# EAGLE board astra (EAGLE 9.7.0)
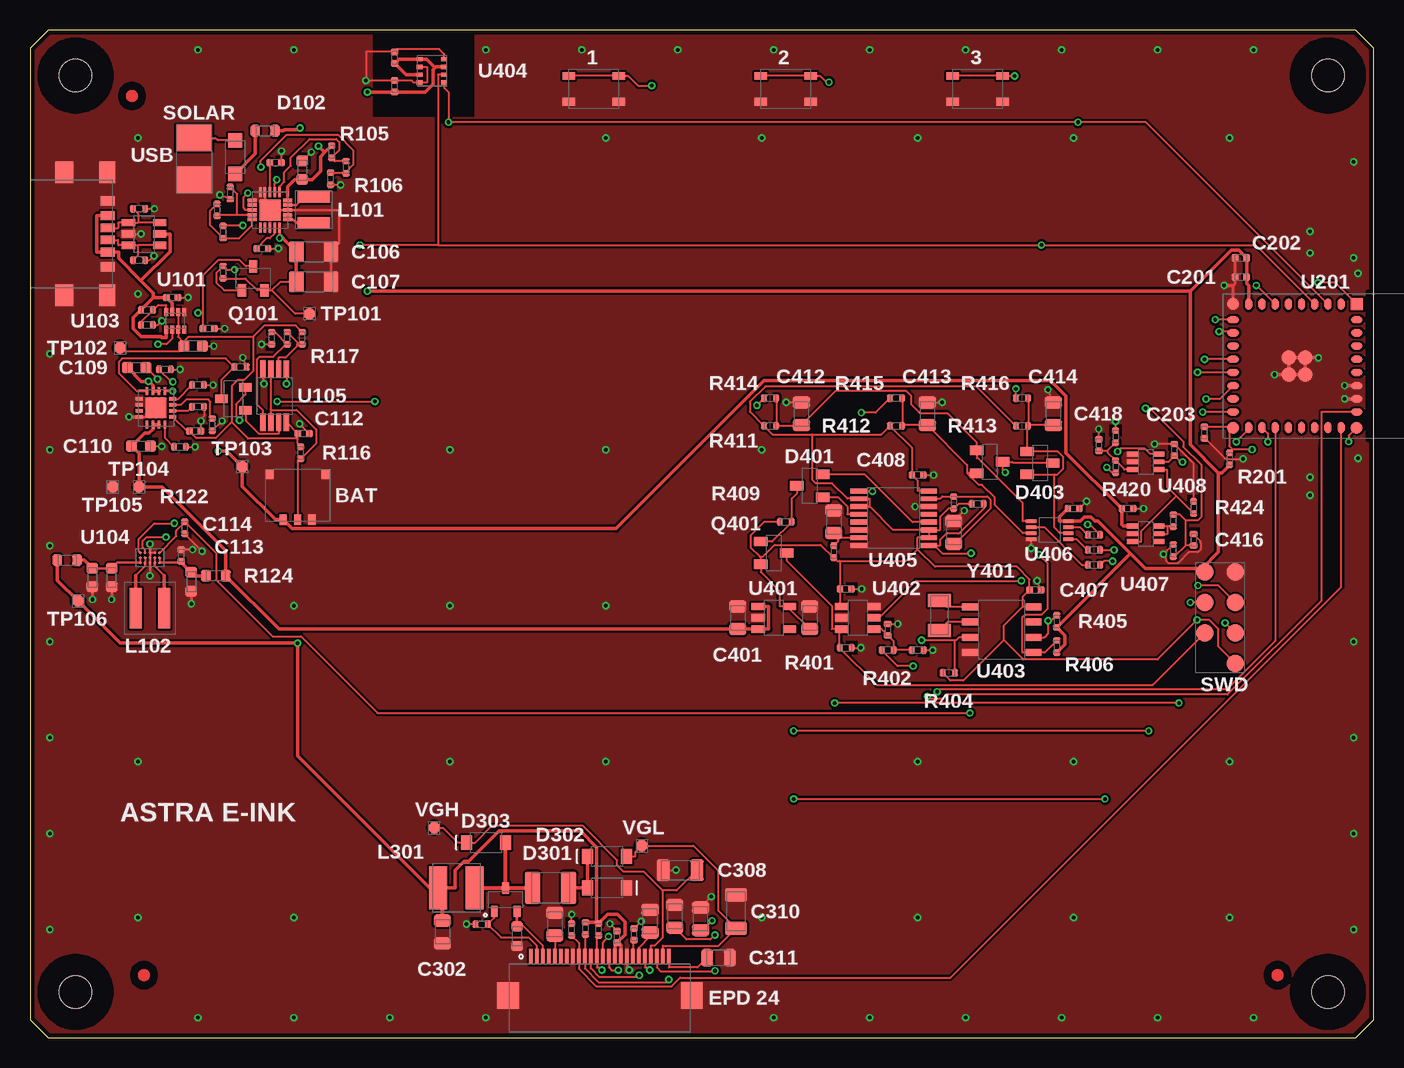
[diagram p0: board, top side]
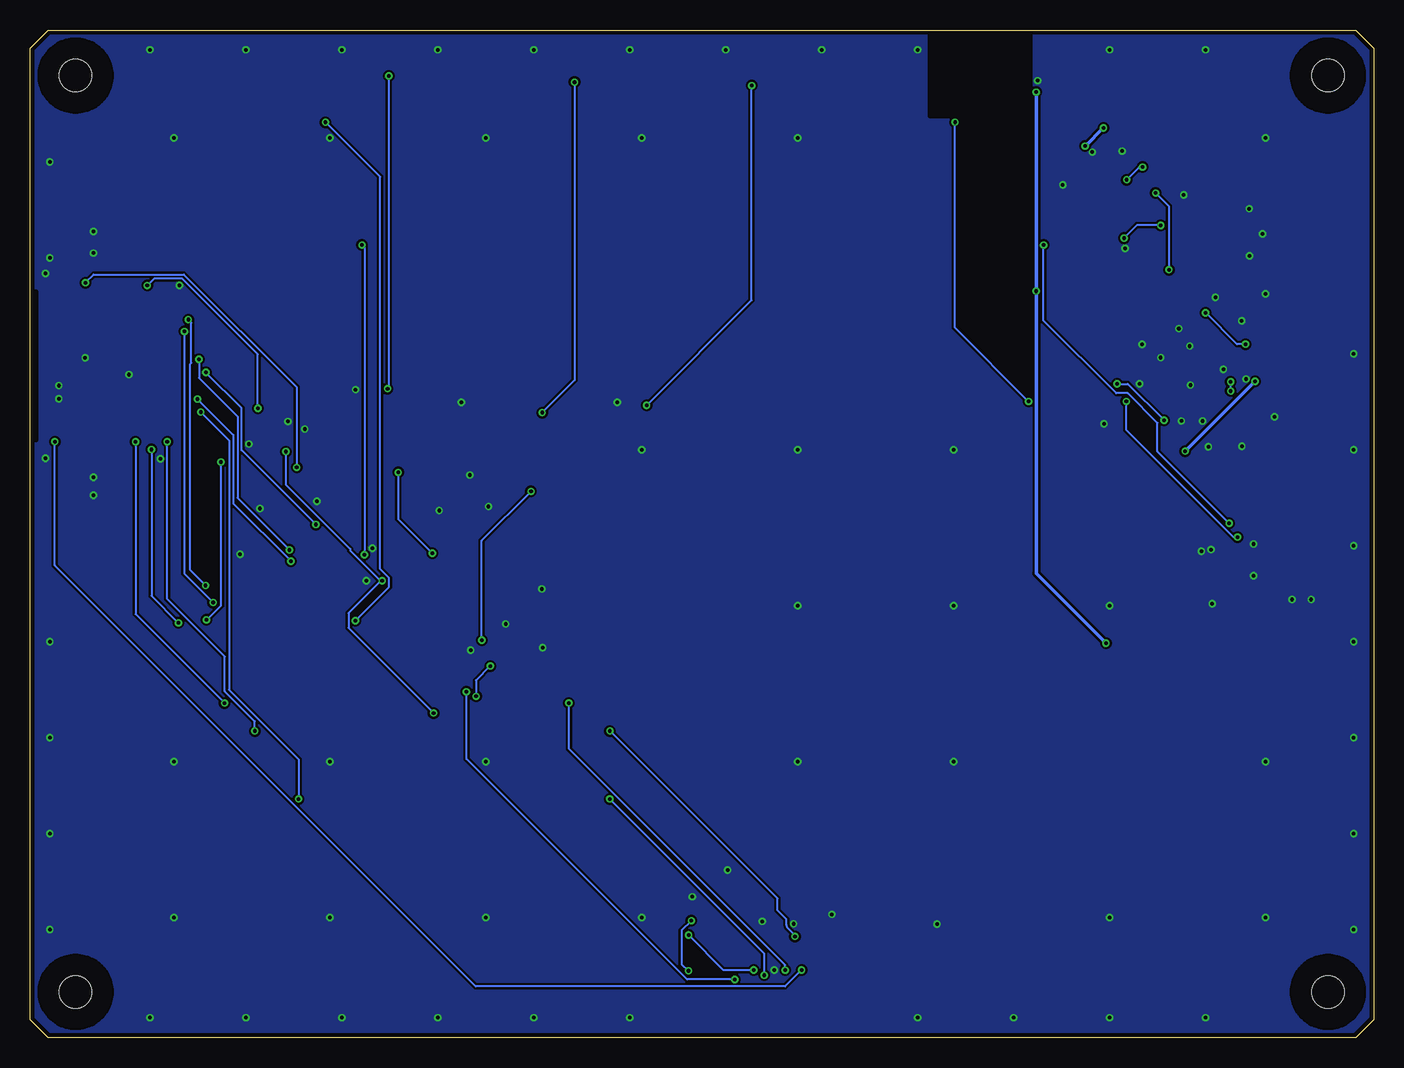
[diagram p1: board, bottom side, seen from below]

Size 112 x 84 mm. Coordinates in mm from the lower left corner, seen from the top.
Outline: 1.5,0 110.5,0 112,1.5 112,82.5 110.5,84 1.5,84 0,82.5 0,1.5 1.5,0
Copper layers (1*16): Top 0.035mm / dielectric 0.93mm / Bottom 0.035mm
Design rules: minimum copper width smd 0.25mm, minimum copper width class=1 0.30mm, minimum copper width 0.15mm, minimum drill size 0.25mm, copper clearance wire_polygon to wire_polygon 0.15mm, copper clearance wire_polygon to pad_smd 0.15mm, copper clearance wire_polygon to via 0.15mm, copper clearance pad_smd to pad_smd 0.15mm, copper clearance pad_smd to via 0.15mm, copper clearance via to via 0.15mm, copper clearance smd to pad (same net) 0.15mm, copper clearance smd to via (same net) 0.15mm, copper clearance smd to smd (same net) 0.15mm, restrict clearance 0mil, dimension clearance 0.35mm, via restrict clearance 0mil, drill distance 0.25mm, keepout clearance 0mil
Net classes: 1 power: width 0.3 mm
Holes 2.7 mm at 3.8,3.8 108.2,3.8 3.8,80.2 108.2,80.2
tRestrict: area 3.8,3.8 to 6.8,6.8; area 0.8,3.8 to 3.8,6.8; area 0.8,0.8 to 3.8,3.8; area 3.8,0.8 to 6.8,3.8; area 108.2,3.8 to 111.2,6.8; area 105.2,3.8 to 108.2,6.8; area 105.2,0.8 to 108.2,3.8; area 108.2,0.8 to 111.2,3.8; area 3.8,80.2 to 6.8,83.2; area 0.8,80.2 to 3.8,83.2; area 0.8,77.2 to 3.8,80.2; area 3.8,77.2 to 6.8,80.2; 5 more areas
bRestrict: area 3.8,3.8 to 6.8,6.8; area 0.8,3.8 to 3.8,6.8; area 0.8,0.8 to 3.8,3.8; area 3.8,0.8 to 6.8,3.8; area 108.2,3.8 to 111.2,6.8; area 105.2,3.8 to 108.2,6.8; area 105.2,0.8 to 108.2,3.8; area 108.2,0.8 to 111.2,3.8; area 3.8,80.2 to 6.8,83.2; area 0.8,80.2 to 3.8,83.2; area 0.8,77.2 to 3.8,80.2; area 3.8,77.2 to 6.8,80.2; 6 more areas
vRestrict: area 3.8,3.8 to 6.8,6.8; area 0.8,3.8 to 3.8,6.8; area 0.8,0.8 to 3.8,3.8; area 3.8,0.8 to 6.8,3.8; area 108.2,3.8 to 111.2,6.8; area 105.2,3.8 to 108.2,6.8; area 105.2,0.8 to 108.2,3.8; area 108.2,0.8 to 111.2,3.8; area 3.8,80.2 to 6.8,83.2; area 0.8,80.2 to 3.8,83.2; area 0.8,77.2 to 3.8,80.2; area 3.8,77.2 to 6.8,80.2; 5 more areas

## Footprints (pad centres in the part's own frame; a part is rotated, then mirrored left to right if it is on the bottom)
C0402 = smd 0.56 x 0.62: 1 -0.48,0; 2 0.48,0
C0603 = smd 0.9 x 0.95: 1 -0.775,0; 2 0.775,0
C1206P = smd 1.25 x 1.75: 1 -1.45,0; 2 1.45,0
EPD_C1210 = smd 1.3 x 2.7: 1 -1.5,0; 2 1.5,0
C0805 = smd 1 x 1.45: 1 -0.95,0; 2 0.95,0
EPD_C1206 = smd 1.1 x 1.8: 1 -1.4,0; 2 1.4,0
ST_SOT23_6_ESD = smd 1.1 x 0.6: 1 -1.3,0.95; 2 -1.3,0; 3 -1.3,-0.95; 4 1.3,-0.95; 5 1.3,0; 6 1.3,0.95
NXP_CFP3_DIODE = smd 1.2 x 1.2: 1 -1.4,0; 2 1.4,0
NXP_SOT23_DIODE = smd 0.7 x 1.05: 1 -0.95,-1; 2 0.95,-1; 3 0,1
MBR0530_CASE425 = smd 0.91 x 1.22: 1 -1.635,0; 2 1.635,0
SOT23_WAKE = smd 1.1 x 0.78: 1 -1.08,0.95; 2 -1.08,-0.95; 3 1.08,0
GCT_USB4135 = smd 0.7 x 1.2: A5 -0.5,3.03; B5 0.5,3.03 | smd 0.76 x 1.2: A9 1.52,3.03; B9 -1.52,3.03 | smd 0.8 x 1.2: A12 2.75,3.03; B12 -2.75,3.03 | smd 1.8 x 1.35: SH1 -5.125,2.98; SH2 5.125,2.98 | smd 1.8 x 1.5: SH3 -5.125,-0.6; SH4 5.125,-0.6
JST_ACH03P_POWER = smd 0.85 x 0.6: 1 2.025,1.2; 2 2.025,0; 3 2.025,-1.2 | smd 0.8 x 0.7: M1 -1.75,2.35; M2 -1.75,-2.35
PV_WIRE_PAIR = smd 2.2 x 3: 1 -1.75,0; 2 1.75,0
SWD_FIXTURE_7 = smd 1.45 x 1.45: 1 -3.81,1.27; 2 -3.81,-1.27; 3 -1.27,1.27; 4 -1.27,-1.27; 5 1.27,1.27; 6 1.27,-1.27; 7 3.81,1.27
FH12_24S_05SH = smd 0.3 x 1.3: 1 -5.75,3.45; 2 -5.25,3.45; 3 -4.75,3.45; 4 -4.25,3.45; 5 -3.75,3.45; 6 -3.25,3.45; 7 -2.75,3.45; 8 -2.25,3.45; 9 -1.75,3.45; 10 -1.25,3.45; 11 -0.75,3.45; 12 -0.25,3.45; 13 0.25,3.45; 14 0.75,3.45; 15 1.25,3.45; 16 1.75,3.45; 17 2.25,3.45; 18 2.75,3.45; 19 3.25,3.45; 20 3.75,3.45; 21 4.25,3.45; 22 4.75,3.45; 23 5.25,3.45; 24 5.75,3.45 | smd 1.8 x 2.2: MP1 -7.65,0.2; MP2 7.65,0.2
BOURNS_SRN3015 = smd 1 x 2.7: 1 -1.1,0; 2 1.1,0
COIL_XGL4015 = smd 0.98 x 3.4: 1 -1.185,0; 2 1.185,0
SRN4018 = smd 1.5 x 3.6: 1 -1.525,0; 2 1.525,0
SOT23_AO3401A = smd 0.7 x 1.05: 1 -0.95,-1; 2 0.95,-1; 3 0,1
BSS138_CASE318 = smd 0.56 x 0.95: 1 -0.95,-0.975; 2 0.95,-0.975; 3 0,0.975
R0402 = smd 0.54 x 0.64: 1 -0.51,0; 2 0.51,0
R0603 = smd 0.8 x 0.95: 1 -0.825,0; 2 0.825,0
ALPS_SKRP = smd 1.05 x 0.65: 1 -2.075,1.075; 2 2.075,1.075; 3 -2.075,-1.075; 4 2.075,-1.075
TP = smd 1 x 1: 1 0,0
SPV_VFQFPN20 = smd 0.8 x 0.25: 1 -1.475,0.8; 2 -1.475,0.4; 3 -1.475,0; 4 -1.475,-0.4; 5 -1.475,-0.8; 11 1.475,-0.8; 12 1.475,-0.4; 13 1.475,0; 14 1.475,0.4; 15 1.475,0.8 | smd 0.25 x 0.8: 6 -0.8,-1.475; 7 -0.4,-1.475; 8 0,-1.475; 9 0.4,-1.475; 10 0.8,-1.475; 16 0.8,1.475; 17 0.4,1.475; 18 0,1.475; 19 -0.4,1.475; 20 -0.8,1.475 | smd 1.75 x 1.75: EP 0,0
TI_RGT16_BQ74 = smd 0.6 x 0.25: 1 -1.4,0.75; 2 -1.4,0.25; 3 -1.4,-0.25; 4 -1.4,-0.75; 9 1.4,-0.75; 10 1.4,-0.25; 11 1.4,0.25; 12 1.4,0.75 | smd 0.25 x 0.6: 5 -0.75,-1.4; 6 -0.25,-1.4; 7 0.25,-1.4; 8 0.75,-1.4; 13 0.75,1.4; 14 0.25,1.4; 15 -0.25,1.4; 16 -0.75,1.4 | smd 1.68 x 1.68: EP 0,0
TI_DRL8_MUX = smd 0.67 x 0.3: 1 -0.74,0.75; 2 -0.74,0.25; 3 -0.74,-0.25; 4 -0.74,-0.75; 5 0.74,-0.75; 6 0.74,-0.25; 7 0.74,0.25; 8 0.74,0.75
RT_WLCSP15 = smd 0.25 x 0.25: A1 -0.4,0.8; A2 0,0.8; A3 0.4,0.8; B1 -0.4,0.4; B2 0,0.4; B3 0.4,0.4; C1 -0.4,0; C2 0,0; C3 0.4,0; D1 -0.4,-0.4; D2 0,-0.4; D3 0.4,-0.4; E1 -0.4,-0.8; E2 0,-0.8; E3 0.4,-0.8
MC_MSOP8_TEMP = smd 1.45 x 0.45: 1 -2.2,0.975; 2 -2.2,0.325; 3 -2.2,-0.325; 4 -2.2,-0.975; 5 2.2,-0.975; 6 2.2,-0.325; 7 2.2,0.325; 8 2.2,0.975
EBYTE_08S1F_LGA40 = smd 1 x 1: 1 -5.15,2.55; 10 -5.15,-7.75; 19 5.15,-7.75; 28 5.15,2.55 | smd 1 x 0.6: 2 -5.15,1.25; 3 -5.15,0.15; 4 -5.15,-0.95; 5 -5.15,-2.05; 6 -5.15,-3.15; 7 -5.15,-4.25; 8 -5.15,-5.35; 9 -5.15,-6.45; 20 5.15,-6.45; 21 5.15,-5.35; 22 5.15,-4.25; 23 5.15,-3.15; 24 5.15,-2.05; 25 5.15,-0.95; 26 5.15,0.15; 27 5.15,1.25 | smd 0.6 x 1: 11 -3.85,-7.75; 12 -2.75,-7.75; 13 -1.65,-7.75; 14 -0.55,-7.75; 15 0.55,-7.75; 16 1.65,-7.75; 17 2.75,-7.75; 18 3.85,-7.75; 29 3.85,2.55; 30 2.75,2.55; 31 1.65,2.55; 32 0.55,2.55; 33 -0.55,2.55; 34 -1.65,2.55; 35 -2.75,2.55; 36 -3.85,2.55 | smd 1.2 x 1.2: 37 -0.675,-1.725; 38 -0.675,-3.125; 39 0.725,-3.125; 40 0.725,-1.725
TI_DBV5_W = smd 1.1 x 0.6: 1 -1.3,0.95; 2 -1.3,0; 3 -1.3,-0.95; 4 1.3,-0.95; 5 1.3,0.95
TI_DDC6_TPL = smd 1.1 x 0.6: 1 -1.35,0.95; 2 -1.35,0; 3 -1.35,-0.95; 4 1.35,-0.95; 5 1.35,0; 6 1.35,0.95
NXP_SO8_RTC = smd 1.3 x 0.6: 1 -2.65,1.905; 2 -2.65,0.635; 3 -2.65,-0.635; 4 -2.65,-1.905; 5 2.65,-1.905; 6 2.65,-0.635; 7 2.65,0.635; 8 2.65,1.905
BOSCH_BME280 = smd 0.5 x 0.35: 1 1.025,0.975; 2 1.025,0.325; 3 1.025,-0.325; 4 1.025,-0.975; 5 -1.025,-0.975; 6 -1.025,-0.325; 7 -1.025,0.325; 8 -1.025,0.975
NXP_TSSOP16_MONO = smd 1.35 x 0.4: 1 -2.925,2.275; 2 -2.925,1.625; 3 -2.925,0.975; 4 -2.925,0.325; 5 -2.925,-0.325; 6 -2.925,-0.975; 7 -2.925,-1.625; 8 -2.925,-2.275; 9 2.925,-2.275; 10 2.925,-1.625; 11 2.925,-0.975; 12 2.925,-0.325; 13 2.925,0.325; 14 2.925,0.975; 15 2.925,1.625; 16 2.925,2.275
TI_DCU8_KEY = smd 0.85 x 0.3: 1 -1.55,0.75; 2 -1.55,0.25; 3 -1.55,-0.25; 4 -1.55,-0.75; 5 1.55,-0.75; 6 1.55,-0.25; 7 1.55,0.25; 8 1.55,0.75
TI_DCK6_SENSE = smd 0.9 x 0.4: 1 -1.1,0.65; 2 -1.1,0; 3 -1.1,-0.65; 4 1.1,-0.65; 5 1.1,0; 6 1.1,0.65
ABRACON_ABS07 = smd 1.1 x 1.9: 1 -1.25,0; 2 1.25,0

## Placement (x,y rotation side)
C101  1uF 16V X5R  [C0402]  11.85,61.7 0 top
C102  4.7uF 16V X5R  [C0603]  13.6,57.65 0 top
C103  4.7uF 16V X5R  [C0603]  22.7,72.3 90 top
C104  10nF 25V X7R  [C0402]  20.48,72.95 0 top
C105  1uF 16V X5R  [C0402]  19.38,65.78 0 top
C106  47uF 10V X5R  [C1206P]  23.65,65.5 0 top
C107  47uF 10V X5R  [C1206P]  23.65,63 0 top
C108  1uF 16V X5R  [C0402]  14.9,59.1 0 top
C109  22uF 16V X5R  [C0603]  8.9,55.85 0 top
C110  22uF 16V X5R  [C0603]  9.25,49.3 0 top
C111  1uF 16V X5R  [C0402]  13.77,50.55 0 top
C112  100nF 16V X7R  [C0402]  22.8,50.35 0 top
C113  22uF 16V X5R  [C0603]  13.45,38 270 top
C114  100nF 16V X7R  [C0402]  12.6,40.2 90 top
C115  22uF 10V X5R  [C0603]  6.8,38.35 270 top
C116  22uF 10V X5R  [C0603]  5.2,38.35 270 top
C201  100 nF  [C0402]  100.95,63.4 180 top
C202  1 µF  [C0402]  100.95,65 180 top
C203  33 pF  [C0402]  97.9,50.45 270 top
C301  4.7uF 50V X7R  [EPD_C1210]  43.4,12.47 0 top
C302  4.7uF 25V X5R  [C0805]  34.38,8.8 270 top
C303  1uF 50V X7R  [C0805]  43.75,9.45 90 top
C304  100nF 16V X7R  [C0402]  48.95,8.4 90 top
C305  1uF 25V X5R  [C0402]  50.35,8.6 90 top
C306  1uF 50V X7R  [C0805]  51.7,9.7 90 top
C307  1uF 50V X7R  [C0805]  53.75,10.1 90 top
C308  1uF 100V X7R  [EPD_C1206]  54.2,13.95 180 top
C309  1uF 50V X7R  [C0805]  55.9,9.9 90 top
C310  1uF 100V X7R  [EPD_C1206]  58.85,10.5 90 top
C311  1uF 50V X7R  [C0805]  57.4,6.65 0 top
C401  4.7u 16V  [C0805]  59,35 90 top
C402  4.7u 16V  [C0805]  65,35 90 top
C403  100n 16V  [C0402]  68,37.4 0 top
C404  10n 50V  [C0402]  71.5,34 90 top
C405  100n 16V  [C0402]  30.4,81.7 90 top
C406  100n 16V  [C0402]  30.4,79.3 90 top
C407  100n 16V  [C0402]  83.8,37.3 0 top
C408  100n 16V  [C0402]  74,46.9 0 top
C409  4.7u 16V  [C0805]  77,42.1 90 top
C410  4.7u 16V  [C0805]  67,43 90 top
C411  100n 16V  [C0402]  87,44.1 0 top
C412  4.7u 16V  [C0805]  64.3,52 90 top
C413  4.7u 16V  [C0805]  74.8,52 90 top
C414  4.7u 16V  [C0805]  85.3,52 90 top
C415  1u 25V  [C0402]  91.5,44.1 0 top
C416  1n 50V  [C0402]  97,41.5 90 top
C417  100n 16V  [C0402]  95.4,49 90 top
C418  10n 50V  [C0402]  89.1,49.4 90 top
D101  USBLC6-2SC6  [ST_SOT23_6_ESD]  9.5,67 0 top
D102  PMEG2010ER,115  [NXP_CFP3_DIODE]  17.1,73.4 90 top
D103  BAT54C,215  [NXP_SOT23_DIODE]  16.95,53.25 90 top
D301  MBR0530 30V Schottky  [MBR0530_CASE425]  48.1,12.47 180 top
D302  MBR0530 30V Schottky  [MBR0530_CASE425]  48.1,15.1 0 top
D303  MBR0530 30V Schottky  [MBR0530_CASE425]  38.02,16.25 0 top
D401  Dual Schottky common anode  [SOT23_WAKE]  65,46 180 top
D402  Dual Schottky common anode  [SOT23_WAKE]  80,48 0 top
D403  Dual Schottky common anode  [SOT23_WAKE]  84.2,47.9 0 top
J101  USB-C power input  [GCT_USB4135]  3.45,67 270 top
J102  LP223439 pack, black / yellow / red  [JST_ACH03P_POWER]  22.3,45.2 270 top
J103  PV+ / PV− wire lands  [PV_WIRE_PAIR]  13.7,73.25 270 top
J201  7-pad SWD fixture  [SWD_FIXTURE_7]  99.2,35 270 top
J301  EPD FPC 24 bottom-contact  [FH12_24S_05SH]  47.5,3.3 0 top
L101  22uH 0.58A  [BOURNS_SRN3015]  23.65,69 270 top
L102  0.47uH 4.4A at 10% drop  [COIL_XGL4015]  10,35.8 180 top
L301  10uH 1.4A Isat  [SRN4018]  35.55,12.47 0 top
Q101  AO3401A  [SOT23_AO3401A]  18.6,63.3 0 top
Q301  BSS138L 50V NMOS  [BSS138_CASE318]  39.65,11.5 0 top
Q401  P-channel wake drive  [SOT23_WAKE]  62,40.4 0 top
R101  5.1k 1%  [R0402]  9.1,69.1 0 top
R102  5.1k 1%  [R0402]  9.1,64.8 0 top
R103  301k 1%  [R0402]  9.75,60.65 0 top
R104  100k 1%  [R0402]  9.75,59.4 0 top
R105  6.8M 1%  [R0402]  25.15,73.85 270 top
R106  360k 1%  [R0402]  26.35,72.55 270 top
R107  1.5M 1%  [R0402]  25.05,71.6 270 top
R108  6.8M 1%  [R0402]  16.1,67.15 270 top
R109  1.5M 1%  [R0402]  15.6,69 270 top
R110  2.7M 1%  [R0402]  16.7,70.4 270 top
R111  1M 1%  [R0402]  16.1,63.8 270 top
R112  10k 1%  [R0402]  11.25,55.7 0 top
R113  2k 1%  [R0402]  12.5,49.25 0 top
R114  68k 1%  [R0402]  14,52.6 0 top
R115  8.66k 1%  [R0402]  14,54.4 0 top
R116  22k 1%  [R0402]  22.58,48.75 270 top
R117  62k 1%  [R0402]  22.7,58.3 270 top
R118  22k 1%  [R0402]  21.45,58.3 270 top
R119  22k 1%  [R0402]  20.15,58.3 270 top
R120  22k 1%  [R0402]  17.55,55.9 0 top
R122  1M 1%  [R0402]  12.9,42.5 270 top
R123  4.7k 1%  [R0402]  15.2,51.1 270 top
R124  0R 1A DFT input  [R0603]  15.5,38.5 0 top
R125  0R 1A DFT output  [R0603]  3.1,39.8 180 top
R126  0R 1A DFT solar  [R0603]  19.6,75.6 180 top
R201  10 kΩ  [R0402]  100,48.25 90 top
R301  10k 1%  [R0402]  37.65,9.45 0 top
R302  3R 1% 100mW  [R0603]  40.6,8.45 90 top
R303  100k 1%  [R0402]  47.4,9 90 top
R304  100k 1%  [R0402]  46.3,9.1 90 top
R305  100k 1%  [R0402]  45.15,9 90 top
R401  30k 1%  [R0402]  68,32.5 0 top
R402  33k 1%  [R0402]  71.5,32.3 0 top
R403  100k 1%  [R0402]  74,32.3 0 top
R404  47k 1%  [R0402]  76.6,30.4 0 top
R405  4.7k 1%  [R0402]  85.6,34.7 90 top
R406  4.7k 1%  [R0402]  85.6,32.6 90 top
R407  47k 1%  [R0402]  77,44.6 90 top
R408  47k 1%  [R0402]  67,40.5 90 top
R409  100k 1%  [R0402]  63,43 0 top
R410  47k 1%  [R0402]  79,44.5 0 top
R411  100k 1%  [R0402]  61.7,51 0 top
R412  100k 1%  [R0402]  72.2,51 0 top
R413  100k 1%  [R0402]  82.7,51 0 top
R414  330R 1%  [R0402]  61.7,53.3 0 top
R415  330R 1%  [R0402]  72.2,53.3 0 top
R416  330R 1%  [R0402]  82.7,53.3 0 top
R417  3.3k 1%  [R0402]  88.7,41.9 0 top
R418  3.3k 1%  [R0402]  88.7,40.65 0 top
R419  3.3k 1%  [R0402]  88.7,39.4 0 top
R420  10k 1%  [R0402]  95.3,43.1 90 top
R421  10k 1%  [R0402]  95.3,40.6 90 top
R422  10k 1%  [R0402]  90.5,47.6 90 top
R423  100k 1%  [R0402]  90.5,50.1 90 top
R424  10k 1%  [R0402]  97,44.2 90 top
SW401  Key 1  [ALPS_SKRP]  47,79.1 0 top
SW402  Key 2  [ALPS_SKRP]  63,79.1 0 top
SW403  Key 3  [ALPS_SKRP]  79,79.1 0 top
TP101  PV_STORE  [TP]  23.3,60.35 270 top
TP102  CHG_IN  [TP]  7.5,57.5 270 top
TP103  VBAT  [TP]  17.7,47.6 270 top
TP104  SYS_AON  [TP]  9.1,45.9 270 top
TP105  GND  [TP]  6.9,45.9 270 top
TP106  VMAIN  [TP]  4,36.4 270 top
TP301  EPD_VGH  [TP]  33.7,17.5 0 top
TP302  EPD_VGL  [TP]  51,16 0 top
U101  SPV1050TTR  [SPV_VFQFPN20]  20,69 270 top
U102  BQ24074RGTR  [TI_RGT16_BQ74]  10.5,52.5 270 top
U103  TPS2116DRLR  [TI_DRL8_MUX]  12.1,59.75 270 top
U104  RT6160AWSC  [RT_WLCSP15]  10,40 270 top
U105  MCP6542-I/MS  [MC_MSOP8_TEMP]  20.4,53.5 270 top
U201  nRF54L15-QFAA + 2.4 GHz PCB antenna  [EBYTE_08S1F_LGA40]  108.05,56 270 top
U401  2.8V always-on  [TI_DBV5_W]  62,35 0 top
U402  One-shot watchdog  [TI_DDC6_TPL]  69,35 0 top
U403  RTC 0x51  [NXP_SO8_RTC]  81,34 0 top
U404  BME280 0x76  [BOSCH_BME280]  33.5,80.6 0 top
U405  Dual event monostable  [NXP_TSSOP16_MONO]  72,43.3 0 top
U406  Key isolation / Schmitt  [TI_DCU8_KEY]  85,42.3 0 top
U407  Gated battery sample  [TI_DCK6_SENSE]  93,42 0 top
U408  Schmitt ADC interlock  [TI_DCK6_SENSE]  93,48 0 top
Y401  32.768 kHz 7pF  [ABRACON_ABS07]  75.8,35.2 270 top

## Library data of the parts
C101 C105 C108 C111 = ASTRA; LCSC: C29266; MPN: CL05A105KO5NNNC
C102 C103 = ASTRA; LCSC: C77045; MPN: GRM188R61C475KE11D
C104 = ASTRA; LCSC: C318576; MPN: CL05B103KA5NNNC
C106 C107 = ASTRA; LCSC: C426659; MPN: GRM31CR61A476KE15L
C109 C110 C113 = ASTRA; LCSC: C5116073; MPN: GRM188R61C226ME01D
C112 C114 C201 C304 C403 C405-C408 C411 C417 = ASTRA; LCSC: C1525; MPN: CL05B104KO5NNNC
C115 C116 = ASTRA; LCSC: C84419; MPN: GRM188R61A226ME15D
C202 C305 C415 = ASTRA; LCSC: C52923; MPN: CL05A105KA5NQNC
C203 = ASTRA; LCSC: C1562; MPN: 0402CG330J500NT
C301 = ASTRA; LCSC: C47783; MPN: CL32B475KBJNNNE
C302 = ASTRA; LCSC: C1779; MPN: CL21A475KAQNNNE
C303 C306 C307 C309 C311 = ASTRA; LCSC: C28323; MPN: CL21B105KBFNNNE
C308 C310 = ASTRA; LCSC: C13832; MPN: CL31B105KCHNNNE
C401 C402 C409 C410 C412-C414 = ASTRA; LCSC: C107365; MPN: CL21B475KOFNNNE
C404 C418 = ASTRA; LCSC: C15195; MPN: CL05B103KB5NNNC
C416 = ASTRA; LCSC: C1523; MPN: 0402B102K500NT
D101 = ASTRA; LCSC: C7519; MPN: USBLC6-2SC6
D102 = ASTRA; LCSC: C82288; MPN: PMEG2010ER,115
D103 = ASTRA; LCSC: C37704; MPN: BAT54C,215
D301-D303 = ASTRA; LCSC: C82046; MPN: MBR0530T1G
D401-D403 = ASTRA; LCSC: C130910; MPN: BAT54A,215
J101 = ASTRA; LCSC: C5438410; MPN: USB4135-GF-A
J102 = ASTRA; LCSC: C5118705; MPN: BM03B-ACHSS-GAN-ETF(LF)(SN)
J103 TP101-TP106 = ASTRA; MPN: PCB-FEATURE
J201 = ASTRA; MPN: PCB pads only
J301 = ASTRA; LCSC: C202112; MPN: FH12-24S-0.5SH(55)
L101 = ASTRA; LCSC: C2918094; MPN: SRN3015-220M
L102 = ASTRA; LCSC: C5452431; MPN: XGL4015-471MEC
L301 = ASTRA; LCSC: C503307; MPN: SRN4018-100M
Q101 Q401 = ASTRA; LCSC: C15127; MPN: AO3401A
Q301 = ASTRA; LCSC: C82045; MPN: BSS138LT1G
R101 R102 = ASTRA; LCSC: C25905; MPN: 0402WGF5101TCE
R103 = ASTRA; LCSC: C25775; MPN: 0402WGF3013TCE
R104 R303-R305 R403 R409 R411-R413 R423 = ASTRA; LCSC: C25741; MPN: 0402WGF1003TCE
R105 R108 = ASTRA; LCSC: C620473; MPN: 0402WGF6804TCE
R106 = ASTRA; LCSC: C45956; MPN: 0402WGF3603TCE
R107 R109 = ASTRA; LCSC: C22276; MPN: 0402WGF1504TCE
R110 = ASTRA; LCSC: C270621; MPN: 0402WGF2704TCE
R111 R122 = ASTRA; LCSC: C26083; MPN: 0402WGF1004TCE
R112 R201 R301 R420-R422 R424 = ASTRA; LCSC: C25744; MPN: 0402WGF1002TCE
R113 = ASTRA; LCSC: C4109; MPN: 0402WGF2001TCE
R114 = ASTRA; LCSC: C36871; MPN: 0402WGF6802TCE
R115 = ASTRA; LCSC: C270576; MPN: 0402WGF8661TCE
R116 R118-R120 = ASTRA; LCSC: C25768; MPN: 0402WGF2202TCE
R117 = ASTRA; LCSC: C37825; MPN: 0402WGF6202TCE
R123 R405 R406 = ASTRA; LCSC: C25900; MPN: 0402WGF4701TCE
R124-R126 = ASTRA; LCSC: C122704; MPN: ERJ3GEY0R00V
R302 = ASTRA; LCSC: C137724; MPN: RC0603FR-073RL
R401 = ASTRA; LCSC: C25776; MPN: 0402WGF3002TCE
R402 = ASTRA; LCSC: C25779; MPN: 0402WGF3302TCE
R404 R407 R408 R410 = ASTRA; LCSC: C25792; MPN: 0402WGF4702TCE
R414-R416 = ASTRA; LCSC: C25104; MPN: 0402WGF3300TCE
R417-R419 = ASTRA; LCSC: C25890; MPN: 0402WGF3301TCE
SW401-SW403 = ASTRA; LCSC: C115360; MPN: SKRPABE010
TP301 TP302 = ASTRA; MPN: PCB test land
U101 = ASTRA; LCSC: C5181469; MPN: SPV1050TTR
U102 = ASTRA; LCSC: C54313; MPN: BQ24074RGTR
U103 = ASTRA; LCSC: C3235557; MPN: TPS2116DRLR
U104 = ASTRA; LCSC: C7065276; MPN: RT6160AWSC
U105 = ASTRA; LCSC: C636338; MPN: MCP6542-I/MS
U201 = ASTRA; LCSC: C54337734; MPN: E73-2G4M08S1F
U401 = ASTRA; LCSC: C5220176; MPN: TPS7A0228PDBVR
U402 = ASTRA; LCSC: C2870554; MPN: TPL5111DDCR
U403 = ASTRA; LCSC: C5151540; MPN: PCF85063AT/AY
U404 = ASTRA; LCSC: C92489; MPN: BME280
U405 = ASTRA; LCSC: C426698; MPN: 74HC123PW,118
U406 = ASTRA; LCSC: C2863927; MPN: SN74AUP3G14DCUR
U407 = ASTRA; LCSC: C2149796; MPN: TPS22919DCKR
U408 = ASTRA; LCSC: C2682139; MPN: SN74AUP1G97DCKR
Y401 = ASTRA; LCSC: C1985277; MPN: ABS07-32.768KHZ-7-1-T

## Nets
ANY_KEY_N: D402.3 D403.3 R410.2 U405.9
BAT_NTC: J102.2 R116.2 U105.3 U105.6
BQ_ILIM: R113.1 U102.12
BQ_ISET: R115.1 U102.16
BQ_ITERM: R123.1 U102.15
BQ_TMR: R114.1 U102.14
BQ_TS: R112.1 U102.1
BTN1: R417.2 U201.15
BTN2: R418.2 U201.14
BTN3: R419.2 U201.16
CHG_DISABLE: D103.3 R120.1 U102.4
CHG_IN: C102.1 C111.1 C112.1 R116.1 R117.1 TP102.1 U102.13 U103.2 U103.7 U105.8
DONE_2V8: C404.1 R402.2 R403.1 U402.4
EPD_BUSY: J301.9 R305.1 U201.27
EPD_CS: J301.12 R303.1 U201.28
EPD_DC: J301.11 U201.18
EPD_GDR: J301.2 Q301.1 R301.2
EPD_MOSI: J301.14 U201.21
EPD_PUMP: C301.2 D301.2 D302.1
EPD_RESE: J301.3 Q301.2 R302.2
EPD_RST: J301.10 R304.1 U201.22
EPD_SCK: J301.13 U201.20
EPD_SW: C301.1 D303.2 L301.2 Q301.3
EPD_VCOM: C311.1 J301.24
EPD_VCORE: C305.1 J301.18
EPD_VGH: C308.1 D303.1 J301.21 TP301.1
EPD_VGL: C310.1 D302.2 J301.23 TP302.1
EPD_VPP: C306.1 J301.19
EPD_VSH1: C307.1 J301.20
EPD_VSH2: C303.1 J301.5
EPD_VSL: C309.1 J301.22
GND: C101.2 C102.2 C103.2 C104.2 C105.2 C106.2 C107.2 C108.2 C109.2 C110.2 C111.2 C112.2 C113.2 C114.2 C115.2 C116.2 C201.2 C202.2 C203.2 C302.2 C303.2 C304.2 C305.2 C306.2 C307.2 C308.2 C309.2 C310.2 C311.2 C401.2 C402.2 C403.2 C404.2 C405.2 C406.2 C407.2 C408.2 C409.2 C410.2 C411.2 C412.2 C413.2 C414.2 C415.2 C416.2 C417.2 C418.2 D101.2 D301.1 J101.A12 J101.B12 J101.SH1 J101.SH2 J101.SH3 J101.SH4 J102.1 J102.M1 J102.M2 J103.2 J201.1 J301.8 J301.17 J301.MP1 J301.MP2 R101.2 R102.2 R104.2 R107.2 R110.2 R112.2 R113.2 R114.2 R115.2 R119.2 R120.2 R122.2 R123.2 R301.1 R302.1 R305.2 R401.2 R403.2 R421.2 R423.2 R424.2 SW401.3 SW401.4 SW402.3 SW402.4 SW403.3 SW403.4 TP105.1 U101.4 U101.5 U101.6 U101.13 U101.18 U101.EP U102.5 U102.6 U102.8 U102.EP U103.1 U104.B1 U104.C1 U104.C2 U104.C3 U105.4 U201.10 U201.30 U201.31 U201.37 U201.38 U201.39 U201.40 U401.2 U402.2 U402.6 U403.4 U404.1 U404.5 U404.7 U405.6 U405.8 U405.14 U406.4 U407.2 U408.1 U408.2
KEY1_N: C412.1 D402.1 R411.2 R414.2 U406.1
KEY1_OUT: R417.1 U406.7
KEY1_SW: R414.1 SW401.1 SW401.2
KEY2_N: C413.1 D402.2 R412.2 R415.2 U406.3
KEY2_OUT: R418.1 U406.5
KEY2_SW: R415.1 SW402.1 SW402.2
KEY3_N: C414.1 D403.1 D403.2 R413.2 R416.2 U406.6
KEY3_OUT: R419.1 U406.2
KEY3_SW: R416.1 SW403.1 SW403.2
KEY_MONO_RC: C410.1 R408.2 U405.7
KEY_PULSE_N: D401.2 U405.12
MAIN_EN: R122.1 U104.A1 U402.5 U408.6
MEAS_FILTER: C418.1 R422.2 R423.1 U408.3
NRST: C203.1 J201.5 R201.2 U201.19
NTC_COLD_REF: R117.2 R118.1 U105.2
NTC_HOT_REF: R118.2 R119.1 U105.5
PULSE_GATE_N: D401.3 Q401.1 R409.2
PV_BUFFER: C105.1 U101.14
PV_EOC: R109.2 R110.1 U101.9
PV_HVSW: L101.1 U101.19
PV_IC_IN: C103.1 R105.1 R126.1 U101.20
PV_IN [power]: D102.1 R126.2
PV_LVSW: L101.2 U101.16
PV_MPP: R105.2 R106.1 U101.1
PV_MPP_REF: C104.1 U101.3
PV_MPP_SET: R106.2 R107.1 U101.2
PV_RAW: D102.2 J103.1
PV_READY_N: Q101.1 R111.1 U101.8
PV_STORE: C106.1 C107.1 Q101.2 R108.1 R111.2 TP101.1 U101.15
PV_UVP: R108.2 R109.1 U101.10
PV_VALID: C108.1 Q101.3 U103.6
RT_SW1: L102.1 U104.B2 U104.B3
RT_SW2: L102.2 U104.D2 U104.D3
RT_VIN_LOCAL: C113.1 C114.1 R124.1 U104.A2 U104.A3
RT_VOUT_LOCAL: C115.1 C116.1 R125.1 U104.E2 U104.E3
RTC_IRQ_N: R404.2 U403.3 U405.1
RTC_MONO_RC: C409.1 R407.2 U405.15
RTC_PULSE_N: D401.1 U405.4
RTC_XI: U403.1 Y401.1
RTC_XO: U403.2 Y401.2
SCL: R405.2 U104.D1 U201.3 U403.6 U404.4
SDA: R406.2 U104.E1 U201.4 U403.5 U404.3
SENSE_SWITCH_EN: R424.1 U407.3 U408.4
SWCLK: J201.3 U201.11
SWDIO: J201.4 U201.12
SYS_AON [power]: C110.1 C401.1 R124.2 TP104.1 U102.10 U102.11 U401.1 U401.3
TEMP_COLD: D103.2 U105.1
TEMP_HOT: D103.1 U105.7
TIMER_DONE: R402.1 U201.29
USB_CC1: D101.1 D101.6 J101.A5 R101.1
USB_CC2: D101.3 D101.4 J101.B5 R102.1
USB_PR: R103.2 R104.1 U103.4
VAON: C402.1 C403.1 C407.1 C408.1 C417.1 J201.7 Q401.2 R404.1 R407.1 R408.1 R409.1 R410.1 R411.1 R412.1 R413.1 U401.5 U402.1 U403.8 U405.2 U405.3 U405.10 U405.11 U405.16 U408.5
VBAT [power]: C109.1 C415.1 J102.3 TP103.1 U102.2 U102.3 U407.1
VBAT_ADC_SRC: R420.1 U407.5 U407.6
VBAT_MEAS_EN: R422.1 U201.1
VBAT_SENSE: C416.1 R420.2 R421.1 U201.7
VBUS [power]: C101.1 D101.5 J101.A9 J101.B9 R103.1 U103.3 U103.5
VMAIN [power]: C201.1 C202.1 C302.1 C304.1 C405.1 C406.1 C411.1 J201.2 J301.15 J301.16 L301.1 R125.2 R201.1 R303.2 R304.2 R405.1 R406.1 TP106.1 U201.9 U404.2 U404.6 U404.8 U406.8
WAKE_MDRV: J201.6 Q401.3 R401.1 U402.3

## Tracks (layer width: path | path; a pad name or v marks a point on that pad's centre or on a via)
ANY_KEY_N  (via drill 0.3 pad 0.6)
  Top 0.18: 75.39,41.02 76.05,40.37 v78.45,40.37 | v81.31,47.12 81.08,47.34 D402.3 81.89,48 81.99,47.9 D403.3 | 75.39,41.02 75.86,41.02 75.86,41.47 76.41,42.02 77.42,42.02 79.51,44.11 R410.2 | U405.9 75.39,41.02
  Bottom 0.18: v81.31,47.12 81.31,43.23 v78.45,40.37
BAT_NTC
  Top 0.18: U105.3 20.07,54.72 20.05,54.7 20.05,52.36 20.07,52.33 | 20.07,52.33 U105.6 | 20.07,52.33 22.22,52.33 23.86,50.69 23.86,49.52 R116.2 22.3,47.96 J102.2
BQ_ILIM
  Top 0.18: R113.1 11.25,49.99 U102.12
BQ_ISET
  Top 0.18: U102.16 12.34,53.25 R115.1
BQ_ITERM
  Top 0.18: R123.1 15.04,51.77 15.04,53.02 14.88,53.18 13.01,53.18 12.58,52.75 U102.15
BQ_TMR
  Top 0.18: R114.1 13.14,52.25 U102.14
BQ_TS  (via drill 0.3 pad 0.6)
  Top 0.18: R112.1 11.77,54.67 v11.9,54.67 | U102.1 v11.9,53.9
  Bottom 0.18: v11.9,53.9 v11.9,54.67
BTN1  (via drill 0.3 pad 0.6)
  Top 0.18: R417.2 88.34,42.77 v88.16,42.77 | U201.15 v97.34,55.45
  Bottom 0.18: v88.16,42.77 94.36,48.97 94.36,52.47 v97.34,55.45
BTN2  (via drill 0.3 pad 0.6)
  Top 0.18: U201.14 v97.91,56.55 | R418.2 v90.37,40.65
  Bottom 0.18: v97.91,56.55 97.91,54.99 94.71,51.79 94.71,44.99 v90.37,40.65
BTN3  (via drill 0.3 pad 0.6)
  Top 0.18: U201.16 99.17,53.23 v98.05,53.23 | v90.24,39.71 89.52,39.71 R419.2
  Bottom 0.18: v98.05,53.23 95.05,50.23 95.05,44.52 v90.24,39.71
CHG_DISABLE
  Top 0.18: D103.3 15.95,54.81 R120.1 16.33,56.61 7.68,56.61 7.4,56.33 7.4,55.39 8.89,53.9 U102.4
CHG_IN
  Top 0.18: 22.32,49.93 C112.1 U105.8 | R116.1 22.32,49.52 22.32,49.93 | 22.32,49.93 18.19,49.93 16.82,51.3 | 16.82,51.3 15.5,49.97 13.87,49.97 C111.1 13.1,50.55 U102.13 | 18.59,58.42 18.59,55.56 17.85,54.82 17.31,54.82 16.82,54.33 16.82,51.3 | TP102.1 7.76,57.24 12.42,57.24 C102.1 12.82,58.03 | R117.1 22.15,59.36 19.54,59.36 18.59,58.42 | 12.82,58.03 13.21,58.42 18.59,58.42 | U103.2 U103.7 12.35,58.42 12.73,58.03 12.82,58.03
DONE_2V8
  Top 0.18: R403.1 R402.2 72.01,33.01 C404.1 70.97,34.05 U402.4
EPD_BUSY
  Top 0.18: U201.27 109.3,37.58 76.71,4.98 54.21,4.98 53.49,4.27 47.2,4.27 45.75,5.72 45.75,5.84 J301.9 45.75,7.89 R305.1
EPD_CS  (via drill 0.3 pad 0.6)
  Top 0.18: U201.28 109.93,50.18 v109.93,49.68 | v47.68,5.63 47.46,5.84 47.25,5.84 J301.12 47.25,8.34 R303.1
  Bottom 0.18: v47.68,5.63 49.05,4.26 74.83,4.26 109.93,39.36 v109.93,49.68
EPD_DC  (via drill 0.3 pad 0.6)
  Top 0.18: v50.8,5.19 50.64,5.04 47.48,5.04 46.75,5.77 J301.11 | U201.18 v97.76,52.15 | v63.67,19.89 v89.62,19.89
  Bottom 0.18: v97.76,52.15 95.4,49.79 95.4,28.99 89.62,23.21 v89.62,19.89 | v63.67,19.89 50.8,7.01 v50.8,5.19
EPD_GDR
  Top 0.18: R301.2 39.26,8.35 41.55,8.35 42.25,7.66 J301.2
  Top 0.2: Q301.1 38.7,9.99 R301.2
EPD_MOSI  (via drill 0.3 pad 0.6)
  Top 0.18: v95.78,27.89 v67.08,27.89 | v49.05,5.61 48.48,5.61 48.25,5.84 J301.14 | U201.21 103.19,50.36 v103.19,49.66
  Bottom 0.18: v49.05,5.61 49.05,6.04 67.08,24.08 v67.08,27.89 | v103.19,49.66 103.19,35.3 v95.78,27.89
EPD_PUMP
  Top 0.3: D302.1 D301.2 C301.2
EPD_RESE
  Top 0.18: J301.3 42.75,7.66 41.13,9.28 R302.2
  Top 0.25: R302.2 Q301.2
EPD_RST  (via drill 0.3 pad 0.6)
  Top 0.18: U201.22 103.8,33.07 99.75,29.02 75.81,29.02 v75.62,28.82 | v53.26,4.83 53.04,4.62 47.39,4.62 46.25,5.76 J301.10 46.25,8.54 R304.1
  Bottom 0.18: v53.26,4.83 57.23,4.83 75.62,23.23 v75.62,28.82
EPD_SCK  (via drill 0.3 pad 0.6)
  Top 0.18: U201.20 101.6,50.71 v100.56,49.67 | v93.26,25.56 v63.65,25.56 | J301.13 47.75,7.91 47.95,8.11 47.95,8.15 v48.23,8.43
  Bottom 0.18: v93.26,25.56 93.26,26.36 95.77,28.87 95.77,31.77 100.56,36.56 v100.56,49.67 | v48.23,8.43 48.23,8.51 48.87,9.15 48.87,9.19 48.91,9.23 48.91,9.35 48.95,9.39 48.95,9.87 49.67,10.59 49.67,11.59 63.63,25.55 v63.65,25.56
EPD_SW
  Top 0.35: Q301.3 D303.2 | Q301.3 C301.1 | L301.2 Q301.3
EPD_VCOM
  Top 0.18: C311.1 55.64,5.84 53.25,5.84 J301.24
EPD_VCORE
  Top 0.18: C305.1 50.25,8.02 J301.18
EPD_VGH
  Top 0.18: 52.73,12.27 51.17,13.82 49.49,13.82 48.95,14.36 48.95,14.79 46.1,17.65 38.49,17.65 37.09,16.25 D303.1 35.67,16.25 34.42,17.5 TP301.1 | C308.1 53.92,12.27 52.73,12.27 | 52.73,12.27 52.73,8.3 52.08,7.66 51.75,7.66 J301.21
EPD_VGL
  Top 0.18: J301.23 52.75,7.66 57.41,7.66 C310.1 57.36,10.59 57.36,13.95 55.31,16 TP302.1 50.45,15.45 50.45,15.1 D302.2
EPD_VPP
  Top 0.18: C306.1 51.7,8.44 50.75,7.49 J301.19
EPD_VSH1  (via drill 0.3 pad 0.6)
  Top 0.18: v51.67,5.62 51.45,5.84 51.25,5.84 J301.20 | v57.09,8.54 56.72,8.18 54.73,8.18 C307.1
  Bottom 0.18: v51.67,5.62 54.17,5.62 v57.09,8.54
EPD_VSH2
  Top 0.18: C303.1 J301.5
EPD_VSL  (via drill 0.3 pad 0.6)
  Top 0.18: v57.11,5.56 57.04,5.49 52.6,5.49 52.25,5.84 J301.22 | v56.86,9.73 56.08,8.95 C309.1
  Bottom 0.18: v56.86,9.73 57.67,8.93 57.67,6.12 v57.11,5.56
GND  (via drill 0.3 pad 0.6)
  Top 0.15: C203.2 97.92,49.97 99.6,48.3 99.62,48.3 99.65,48.27 99.7,48.27 99.72,48.24 v101.12,48.24 | R424.2 97,47.86 95.4,49.46 C417.2 | U105.4 19.43,54.58 v19.5,54.5 | R104.2 10.63,59.4 v10.98,59.75
  Top 0.18: U404.1 34.52,82 34.12,82.41 30.63,82.41 C405.2 28,82.18 v28,79.78 C406.2 31.82,79.78 31.98,79.62 U404.5 33.1,79.62 33.1,80.92 U404.7 | U104.B1 U104.C1 U104.C2 U104.C3 | D101.2 v9.25,67 | C103.2 v23.44,73.82 | C104.2 v20.96,73.9 | R119.2 v19.3,57.79 | C112.2 v22.47,51.16 | C308.2 v53.85,13.95 | U405.14 v73.78,44.27 | C408.2 v75.33,46.9 | C409.2 v77.88,43.93 | C412.2 v63.05,52.95 | R120.2 v17.73,56.69 | R305.2 v45.15,10.26 | C309.2 v56.78,11.73 | U406.4 v83.45,40.8 | C411.2 v88.08,44.7 | C414.2 v84.86,54.01 | R421.2 v94.49,40.3 | R112.2 v12.51,55.7 | C111.2 v14.25,51.4 | C305.2 v50.95,9.68 | R401.2 v69.26,32.5 | R101.2 v10.36,69.1 | C101.2 v13.18,61.7 | C102.2 v15.32,57.65 | R107.2 v25.9,71.09 | R110.2 v15.82,70.25 | C105.2 v20.71,65.78 | C108.2 v16.23,59.1 | R113.2 v13.76,49.25 | R123.2 v16.01,51.4 | R115.2 v15.26,54.4 | C109.2 v10.63,54.9 | C110.2 v10.97,49.3 | R122.2 v14.35,40.54 | R301.1 v36.39,9.45 | C403.2 v69.33,37.4 | R403.2 v75.26,32.3 | C404.2 v72.35,34.48 | C407.2 v83.95,38.09 | C415.2 v92.83,44.1 | C417.2 v93.75,49.48 | R423.2 v90.5,51.36 | C418.2 v89.1,50.73 | R102.2 9.97,64.8 v10.33,65.16 | R114.2 14.51,51.8 14.31,51.6 | J301.17 49.75,5.83 v49.95,5.63 | C416.2 97,41.94 97.56,41.38 97.56,41.3 97.6,41.26 97.6,40.7 97.4,40.5 97.36,40.5 97.32,40.46 96.6,40.46 95.72,39.58 95.68,39.58 95.64,39.54 94.92,39.54 94.72,39.74 94.72,39.86 94.68,39.9 94.68,39.98 94.56,40.1 | C304.2 v48.35,9.48 | C413.2 v76.05,52.95
  Top 0.2: U102.8 9.75,51.75 U102.EP | U104.C1 v10,41.15 | U104.C3 v10,38.5
  Top 0.22: U101.4 19.6,69.4 U101.EP U101.18 25.75,69 25.75,66.25 C106.2 C107.2 | C114.2 v13.55,40.68
  Top 0.24: C116.2 v5.2,36.52 | C115.2 v6.8,36.52 | C113.2 v13.45,36.17
  Top 0.26: C202.2 C201.2 100.47,62.87 100.3,62.7 U201.10
  Top 0.28: 100.3,62.7 v99.55,62.7
  Top 0.3: U201.39 U201.40 U201.37 | U201.37 U201.38 U201.39 | U201.37 v107.4,56.67 | U201.39 v103.75,55.27 | U201.31 v109.6,54.35 | U201.30 v109.6,53.25 | U102.8 v8.25,51.75
  other vias: 14,1.65 14,82.35 22,1.65 22,82.35 30,1.65 38,1.65 38,82.35 46,82.35 54,82.35 62,1.65 62,82.35 70,1.65 70,82.35 78,1.65 78,82.35 86,1.65 86,82.35 94,1.65 94,82.35 102,1.65 102,82.35 1.65,9 110.35,9 1.65,17 110.35,17 1.65,25 110.35,25 1.65,33 110.35,33 1.65,41 1.65,49 1.65,57 110.35,65 110.35,73 9,10 9,23 9,62 9,75 22,10 22,36 35,23 35,36 35,49 48,23 48,36 48,49 48,75 61,10 61,49 61,75 74,10 74,23 74,75 87,10 87,23 87,75 100,10 100,23 100,75 106.7,45.2 106.7,46.7 106.7,65.4 106.7,67.2 110.7,48.3 110.7,63.7
  pour Top (isolate 0.18, rank 6, no thermals): 1.69,0.45 110.31,0.45 111.55,1.69 111.55,82.31 110.31,83.55 1.69,83.55 0.45,82.31 0.45,1.69
  pour Bottom (isolate 0.18, rank 6, no thermals): 1.69,0.45 110.31,0.45 111.55,1.69 111.55,82.31 110.31,83.55 1.69,83.55 0.45,82.31 0.45,1.69
  cutout Top: 10.66,5.2 10.65,5.35 10.62,5.5 10.57,5.64 10.5,5.78 10.42,5.91 10.32,6.02 10.21,6.12 10.08,6.2 9.94,6.27 9.8,6.32 9.65,6.35 9.5,6.36 9.35,6.35 9.2,6.32 9.06,6.27 8.92,6.2 8.79,6.12 8.68,6.02 8.58,5.91 8.5,5.78 8.43,5.64 8.38,5.5 8.35,5.35 8.34,5.2 8.35,5.05 8.38,4.9 8.43,4.76 8.5,4.62 8.58,4.49 8.68,4.38 8.79,4.28 8.92,4.2 9.06,4.13 9.2,4.08 9.35,4.05 9.5,4.04 9.65,4.05 9.8,4.08 9.94,4.13 10.08,4.2 10.21,4.28 10.32,4.38 10.42,4.49 10.5,4.62 10.57,4.76 10.62,4.9 10.65,5.05
  cutout Top: 105.16,5.2 105.15,5.35 105.12,5.5 105.07,5.64 105,5.78 104.92,5.91 104.82,6.02 104.71,6.12 104.58,6.2 104.44,6.27 104.3,6.32 104.15,6.35 104,6.36 103.85,6.35 103.7,6.32 103.56,6.27 103.42,6.2 103.29,6.12 103.18,6.02 103.08,5.91 103,5.78 102.93,5.64 102.88,5.5 102.85,5.35 102.84,5.2 102.85,5.05 102.88,4.9 102.93,4.76 103,4.62 103.08,4.49 103.18,4.38 103.29,4.28 103.42,4.2 103.56,4.13 103.7,4.08 103.85,4.05 104,4.04 104.15,4.05 104.3,4.08 104.44,4.13 104.58,4.2 104.71,4.28 104.82,4.38 104.92,4.49 105,4.62 105.07,4.76 105.12,4.9 105.15,5.05
  cutout Top: 9.66,78.5 9.65,78.65 9.62,78.8 9.57,78.94 9.5,79.08 9.42,79.21 9.32,79.32 9.21,79.42 9.08,79.5 8.94,79.57 8.8,79.62 8.65,79.65 8.5,79.66 8.35,79.65 8.2,79.62 8.06,79.57 7.92,79.5 7.79,79.42 7.68,79.32 7.58,79.21 7.5,79.08 7.43,78.94 7.38,78.8 7.35,78.65 7.34,78.5 7.35,78.35 7.38,78.2 7.43,78.06 7.5,77.92 7.58,77.79 7.68,77.68 7.79,77.58 7.92,77.5 8.06,77.43 8.2,77.38 8.35,77.35 8.5,77.34 8.65,77.35 8.8,77.38 8.94,77.43 9.08,77.5 9.21,77.58 9.32,77.68 9.42,77.79 9.5,77.92 9.57,78.06 9.62,78.2 9.65,78.35
  cutout Top: 9.14,68.58 10.08,68.58 10.08,69.62 9.14,69.62
  cutout Top: 9.14,64.28 10.08,64.28 10.08,65.32 9.14,65.32
  cutout Top: 9.79,58.88 10.73,58.88 10.73,59.92 9.79,59.92
  cutout Top: 11.85,61.19 12.81,61.19 12.81,62.21 11.85,62.21
  cutout Top: 13.72,56.98 15.03,56.98 15.03,58.33 13.72,58.33
  cutout Top: 22.02,72.42 23.38,72.42 23.38,73.72 22.02,73.72
  cutout Top: 20.48,72.44 21.44,72.44 21.44,73.46 20.48,73.46
  cutout Top: 24.53,70.62 25.57,70.62 25.57,71.56 24.53,71.56
  cutout Top: 16.18,69.42 17.22,69.42 17.22,70.36 16.18,70.36
  cutout Top: 19.38,65.27 20.34,65.27 20.34,66.29 19.38,66.29
  cutout Top: 14.9,58.59 15.86,58.59 15.86,59.61 14.9,59.61
  cutout Top: 11.29,55.18 12.23,55.18 12.23,56.22 11.29,56.22
  cutout Top: 12.54,48.73 13.48,48.73 13.48,49.77 12.54,49.77
  cutout Top: 14.04,52.08 14.98,52.08 14.98,53.12 14.04,53.12
  cutout Top: 14.68,50.12 15.72,50.12 15.72,51.06 14.68,51.06
  cutout Top: 14.04,53.88 14.98,53.88 14.98,54.92 14.04,54.92
  cutout Top: 9.03,55.17 10.32,55.17 10.32,56.52 9.03,56.52
  cutout Top: 9.38,48.62 10.68,48.62 10.68,49.98 9.38,49.98
  cutout Top: 13.77,50.04 14.73,50.04 14.73,51.06 13.77,51.06
  cutout Top: 19.63,57.32 20.67,57.32 20.67,58.26 19.63,58.26
  cutout Top: 17.59,55.38 18.53,55.38 18.53,56.42 17.59,56.42
  cutout Top: 22.8,49.84 23.76,49.84 23.76,50.86 22.8,50.86
  cutout Top: 12.38,41.52 13.42,41.52 13.42,42.46 12.38,42.46
  cutout Top: 97.39,49.49 98.41,49.49 98.41,50.45 97.39,50.45
  cutout Top: 36.67,8.93 37.61,8.93 37.61,9.97 36.67,9.97
  cutout Top: 48.44,8.4 49.46,8.4 49.46,9.36 48.44,9.36
  cutout Top: 49.84,8.6 50.86,8.6 50.86,9.56 49.84,9.56
  cutout Top: 44.63,9.04 45.67,9.04 45.67,9.98 44.63,9.98
  cutout Top: 68,36.89 68.96,36.89 68.96,37.91 68,37.91
  cutout Top: 68.04,31.98 68.98,31.98 68.98,33.02 68.04,33.02
  cutout Top: 74.04,31.78 74.98,31.78 74.98,32.82 74.04,32.82
  cutout Top: 70.99,34 72.01,34 72.01,34.96 70.99,34.96
  cutout Top: 83.8,36.79 84.76,36.79 84.76,37.81 83.8,37.81
  cutout Top: 29.89,81.7 30.91,81.7 30.91,82.66 29.89,82.66
  cutout Top: 29.89,79.3 30.91,79.3 30.91,80.26 29.89,80.26
  cutout Top: 74,46.39 74.96,46.39 74.96,47.41 74,47.41
  cutout Top: 87,43.59 87.96,43.59 87.96,44.61 87,44.61
  cutout Top: 91.5,43.59 92.46,43.59 92.46,44.61 91.5,44.61
  cutout Top: 94.78,40.64 95.82,40.64 95.82,41.58 94.78,41.58
  cutout Top: 96.49,41.5 97.51,41.5 97.51,42.46 96.49,42.46
  cutout Top: 94.89,49 95.91,49 95.91,49.96 94.89,49.96
  cutout Top: 89.98,50.14 91.02,50.14 91.02,51.08 89.98,51.08
  cutout Top: 96.48,44.24 97.52,44.24 97.52,45.18 96.48,45.18
  cutout Top: 88.59,49.4 89.61,49.4 89.61,50.36 88.59,50.36
  cutout Top: 28.6,76.8 37,76.8 37,83.5 28.6,83.5
KEY1_N
  Top 0.18: U406.1 82.77,43.05 82.77,44.57 79.04,48.3 78.92,48.3 D402.1 78.92,49.6 76.47,52.05 74.2,52.05 73.45,52.79 73.45,53.5 73.03,53.92 67.17,53.92 C412.1 64.25,51 R411.2 R414.2
KEY1_OUT
  Top 0.18: U406.7 87.54,42.55 R417.1
KEY1_SW  (via drill 0.3 pad 0.6)
  Top 0.18: v51.83,79.36 50.67,79.36 49.86,80.17 SW401.2 SW401.1 | R414.1 v60.6,52.71
  Bottom 0.18: v60.6,52.71 51.83,61.47 v51.83,79.36
KEY2_N
  Top 0.18: 78.11,47.05 79.09,46.07 79.36,46.07 80.42,45.02 80.42,44.4 82.77,42.05 U406.3 | 72.76,51.05 R412.2 | 72.76,51.05 C413.1 78.11,47.74 78.11,47.05 | 72.76,51.05 72.76,53.25 R415.2 | D402.2 78.11,47.05
KEY2_OUT
  Top 0.18: U406.5 87.23,41.55 88.13,40.65 R418.1
KEY2_SW  (via drill 0.3 pad 0.6)
  Top 0.18: SW402.1 SW402.2 65.86,80.17 66.39,79.65 v66.6,79.65 | R415.1 70.49,52.1 v69.31,52.1
  Bottom 0.18: v66.6,79.65 66.6,54.81 v69.31,52.1
KEY3_N
  Top 0.18: 85.4,46.95 85.66,46.95 86.14,47.43 86.14,48.39 85.67,48.85 D403.1 83.12,50.91 R413.2 | D403.2 85.4,46.95 | 85.4,46.95 85.4,42.52 85.87,42.05 U406.6 | C414.1 83.26,51.05 R413.2 | R416.2 R413.2
KEY3_OUT
  Top 0.18: U406.2 84.56,42.55 87.71,39.4 R419.1
KEY3_SW  (via drill 0.3 pad 0.6)
  Top 0.18: SW403.1 SW403.2 81.86,80.17 v82.09,80.17 | R416.1 v82.19,54.09
  Bottom 0.18: v82.09,80.17 82.09,54.2 v82.19,54.09
KEY_MONO_RC
  Top 0.18: 67.38,41.67 U405.7 | C410.1 67.38,41.67 | R408.2 67.38,41.38 67.38,41.67
KEY_PULSE_N
  Top 0.18: U405.12 73.57,42.98 69.6,46.95 D401.2
MAIN_EN  (via drill 0.3 pad 0.6)
  Top 0.18: v78.35,27.06 28.98,27.06 22.59,33.44 20.21,33.44 15.5,38.16 15.5,40.41 R122.1 12.9,42.95 12.21,42.26 12.21,41.8 U104.A1 | U402.5 70.78,35 73.86,38.08 v82.65,38.08 | U408.6 93.39,48.65 92.94,49.11 90.93,49.11 v90.67,48.85
  Bottom 0.18: 82.75,38.08 85.45,35.38 85.45,34.16 v78.35,27.06 | 82.75,38.08 v82.65,38.08 | v90.67,48.85 90.67,46.12 85.29,40.74 85.29,40.62 82.75,38.08
MEAS_FILTER
  Top 0.18: U408.3 91.19,47.35 91.19,47.42 R422.2 89.83,48.78 89.83,48.92 | 89.83,48.92 R423.1 | C418.1 89.83,48.92
NRST  (via drill 0.3 pad 0.6)
  Top 0.18: 100.26,49.02 R201.2 | v101.87,49.02 100.26,49.02 | 100.26,49.02 99.96,49.32 99.96,50.51 U201.19 100.22,50.93 C203.1 | J201.5 v99.63,34.57
  Bottom 0.18: v101.87,49.02 101.87,36.81 v99.63,34.57
NTC_COLD_REF
  Top 0.18: 22.26,57.79 22.26,57.65 21.29,56.68 20.73,56.68 U105.2 | R118.1 22.26,58 22.26,57.79 | 22.26,57.79 R117.2
NTC_HOT_REF
  Top 0.18: U105.5 19.43,52.28 18.94,52.76 18.94,56.55 19.15,56.75 20.28,56.75 21.32,57.79 R118.2 20.43,58.81 R119.1
PULSE_GATE_N
  Top 0.18: Q401.1 61.86,41.35 R409.2 63.51,44.94 63.92,45.35 D401.3
PV_BUFFER
  Top 0.18: U101.14 20.39,67.51 20.39,67.03 19.98,66.63 19.74,66.63 C105.1
PV_EOC
  Top 0.18: 17.28,68.6 U101.9 | R109.2 15.71,68.6 17.28,68.6 | 17.28,68.6 17.28,70.33 R110.1
PV_HVSW
  Top 0.22: L101.1 22.9,70.1 22.2,69.4 U101.19
PV_IC_IN  (via drill 0.3 pad 0.6)
  Top 0.2: U101.20 21.48,70.15
  Top 0.3: 21.48,70.15 21.48,70.95 22.05,71.53 C103.1 23.5,71.53 24.22,72.25 24.22,73.45 24.56,73.79 | 24.56,73.79 25.13,74.36 R105.1 | R126.1 21.11,75.6 21.16,75.64 21.2,75.64 21.23,75.68 22.36,75.68 v22.52,75.84 | v24.04,74.32 24.56,73.79
  Bottom 0.3: v22.52,75.84 v24.04,74.32
PV_IN
  Top 0.3: R126.2 18.77,73.68 D102.1
PV_LVSW
  Top 0.22: L101.2 22.25,67.9 21.95,68.2 U101.16
PV_MPP
  Top 0.17: 21.2,72.13 21.2,71.35 20.8,70.95 U101.1
  Top 0.18: 21.2,72.13 21.75,72.68 21.75,73.36 23.3,74.91 25.53,74.91 25.78,74.66 25.78,73.97 R105.2 25.43,73.06 R106.1
PV_MPP_REF
  Top 0.18: U101.3 C104.1
PV_MPP_SET  (via drill 0.3 pad 0.6)
  Top 0.17: v20.57,71.52 20.57,71.38 20.4,71.18 U101.2
  Top 0.18: v19.24,72.57 19.24,73.1 21.4,75.25 25.67,75.25 26.95,73.98 26.95,72.76 26.3,72.11 26.11,72.11 | 26.11,72.11 26.28,72.11 R106.2 | R107.1 26.11,72.11
  Bottom 0.18: v20.57,71.52 19.52,72.57 v19.24,72.57
PV_RAW
  Top 0.18: J103.1 15.46,75 15.66,74.8 D102.2
PV_READY_N  (via drill 0.3 pad 0.6)
  Top 0.18: v17.06,64.01 16.4,64.01 R111.1 15.52,63.73 15.52,62.95 16.17,62.3 Q101.1 | U101.8 17.97,69 17.8,69.17 17.8,70.05 v18.16,70.41
  Bottom 0.18: v18.16,70.41 17.06,69.31 v17.06,64.01
PV_STORE  (via drill 0.3 pad 0.6)
  Top 0.18: v20.8,66.65 20.8,66.95 | R108.1 16.15,67.71 v17.74,67.71 | R111.2 17.95,63.29 18.94,62.3 Q101.2 20.16,62.3 | TP101.1 22.11,60.35 20.16,62.3 | C107.1 20.86,63 20.16,62.3
  Top 0.22: U101.15 20.8,66.95
  Top 0.3: C107.1 C106.1 20.8,66.95
  Bottom 0.18: v17.74,67.71 19.73,67.71 v20.8,66.65
PV_UVP
  Top 0.18: U101.10 18.52,67.71 17.46,66.64 R108.2 15.02,67.72 15.02,68.92 R109.1
PV_VALID  (via drill 0.3 pad 0.6)
  Top 0.18: 14.42,60.42 14.42,63.56 15.71,64.85 17.44,64.85 17.99,64.3 Q101.3 | C108.1 14.42,60.42 | v14,60.42 14.42,60.42 | U103.6 11.85,58.27 11.38,57.8 v10.67,57.8
  Bottom 0.18: v10.67,57.8 11.38,57.8 v14,60.42
RT_SW1
  Top 0.18: U104.B2 U104.B3
  Top 0.2: 11.19,38.52 10.4,39.3 U104.B3
  Top 0.3: 11.19,38.52 L102.1
RT_SW2
  Top 0.18: U104.D2 U104.D3
  Top 0.2: 8.81,38.52 9.6,39.3 U104.D3
  Top 0.3: 8.81,38.52 L102.2
RT_VIN_LOCAL
  Top 0.18: U104.A2 U104.A3
  Top 0.2: C114.1 12.48,39.6 U104.A3
  Top 0.3: R124.1 13.72,38.5 C113.1 12.6,39.62 C114.1
RT_VOUT_LOCAL
  Top 0.18: U104.E2 U104.E3
  Top 0.2: C116.1 C115.1 7.28,39.6 U104.E3
  Top 0.3: R125.1 4.53,39.8 C116.1
RTC_IRQ_N  (via drill 0.3 pad 0.6)
  Top 0.18: 77.11,33.13 77.21,33.13 77.44,33.37 U403.3 | v74.33,33.13 77.11,33.13 | R404.2 77.11,33.13 | U405.1 70.19,45.58 v70.23,45.53
  Bottom 0.18: v74.33,33.13 74.33,41.43 v70.23,45.53
RTC_MONO_RC
  Top 0.18: C409.1 77.1,41.15 80.07,44.12 80.07,44.85 79.81,45.11 R407.2 76.04,45.11 75.86,44.92 U405.15
RTC_PULSE_N
  Top 0.18: U405.4 68.14,43.62 68.14,44.27 67.37,45.05 D401.1
RTC_XI
  Top 0.18: Y401.1 76.34,35.91 U403.1
RTC_XO
  Top 0.18: Y401.2 76.48,34.63 U403.2
SCL  (via drill 0.3 pad 0.6)
  Top 0.18: U104.D1 9.6,40.63 9.41,40.82 9.41,41.4 9.73,41.72 v11.33,41.72 | R405.2 85.14,34.76 v84.87,34.76 84.87,33.68 84.56,33.37 U403.6 | U201.3 93.04,76.31 v87.36,76.31 v34.89,76.31 34.89,78.83 34.52,79.19 U404.4 | v20.61,53.03 v28.75,53.03
  Bottom 0.18: v11.33,41.72 11.67,41.72 20.61,50.66 v20.61,53.03 | v84.87,34.76 82.07,37.55 82.07,38.32 82.81,39.05 82.81,71.76 v87.36,76.31 | v28.75,53.03 34.89,59.17 v34.89,76.31
SDA  (via drill 0.3 pad 0.6)
  Top 0.18: 34.02,66.07 v27.5,66.07 | 34.02,66.07 v84.33,66.07 102.18,66.07 U201.4 | 34.02,66.07 34.02,80.28 U404.3 | U104.E1 9.05,40.55 9.05,41.56 10.36,42.87 v12.03,42.87 | v84.12,40.25 84.84,39.52 84.84,35.76 84.35,35.27 82.96,35.27 82.74,35.05 82.74,32.09 U403.5 84.58,32.09 R406.2
  Bottom 0.18: v12.03,42.87 18.01,48.86 18.01,51.24 20.5,53.72 21.45,53.72 27.5,59.77 v27.5,66.07 | v84.33,66.07 84.12,65.86 v84.12,40.25
SENSE_SWITCH_EN
  Top 0.18: 95.56,45.13 94.81,45.88 94.81,47.35 U408.4 | R424.1 95.56,45.13 | 95.56,45.13 92.61,42.19 92.61,41.35 U407.3
SWCLK  (via drill 0.3 pad 0.6)
  Top 0.18: J201.3 99.05,37.69 v97.36,37.69 | U201.11 v98.81,59.85
  Bottom 0.18: v97.36,37.69 98.64,38.97 98.64,56.15 98.55,56.24 98.55,59.59 v98.81,59.85
SWDIO  (via drill 0.3 pad 0.6)
  Top 0.18: U201.12 100.19,58.86 v99.13,58.86 | J201.4 v96.73,36.27
  Bottom 0.18: v99.13,58.86 99.13,38.67 v96.73,36.27
SYS_AON
  Top 0.3: U401.1 61.57,35.95 61.57,34.05 U401.3 C401.1 20.77,34.05 R124.2 16.32,40.6 11.02,45.9 TP104.1 9.1,48.67 C110.1 9.55,50.38 9.9,50.38 10.25,50.73 U102.10 U102.11
TEMP_COLD  (via drill 0.3 pad 0.6)
  Top 0.18: v17.46,51.47 17.17,51.76 17.17,52.81 17.95,53.59 D103.2 | U105.1 v21.38,54.49
  Bottom 0.18: v21.38,54.49 v21.37,54.49 | v21.37,54.49 | v21.37,54.49 20.48,54.49 v17.46,51.47
TEMP_HOT
  Top 0.18: D103.1 18.03,52.22 18.03,51.38 19.09,50.32 20.73,50.32 U105.7
TIMER_DONE  (via drill 0.3 pad 0.6)
  Top 0.16: 107.65,49.35 107.65,52.15 U201.29
  Top 0.18: 107.65,49.35 107.65,36.41 99.83,28.59 76.4,28.59 76.05,28.24 75.02,28.24 v74.81,28.45 | v73.63,30.97 72.32,30.97 R402.1
  Bottom 0.18: v73.63,30.97 74.81,29.78 v74.81,28.45
USB_CC1
  Top 0.18: J101.A5 7.34,67.5 7.34,67.89 7.39,67.95 D101.1 9.01,67.95 | D101.6 9.01,67.95 | R101.1 9.01,68.68 9.01,67.95
USB_CC2
  Top 0.18: J101.B5 7.34,66.5 7.34,66.11 7.39,66.05 D101.3 9.01,66.05 | D101.4 9.01,66.05 | R102.1 9.01,65.22 9.01,66.05
USB_PR
  Top 0.18: R104.1 9.24,59.63 R103.2 10.69,61.08 11.35,61.08 U103.4
VAON  (via drill 0.3 pad 0.6)
  Top 0.18: 73.99,40.7 75.44,39.25 82.27,39.25 83.32,38.2 C407.1 82.74,36.72 82.74,35.91 | 81.17,33.14 77.79,29.77 76.72,29.77 R404.1 | 81.17,33.14 82.8,31.51 93.98,31.51 v97.29,34.82 98.3,34.82 99.07,34.05 99.07,32.59 J201.7 | v96.08,47.98 95.94,47.98 C417.1 94.88,48 U408.5 | 65.22,50.28 70.97,50.28 R412.1 73.52,49.17 C408.1 73.99,46.43 73.99,45.58 U405.16 | 65.22,50.28 61.91,50.28 R411.1 60.02,52.17 60.02,53 61.3,54.28 78.91,54.28 R413.1 | 65.22,50.28 65.22,46.5 65.53,46.19 66.87,46.19 68.14,44.92 U405.2 70.01,44.92 70.01,44.27 | 81.17,33.14 81.17,34.34 82.74,35.91 | 67.52,39.73 73.02,39.73 73.99,40.7 | 67.52,39.73 67.26,39.73 R408.1 65.91,41.08 62.08,41.08 61.09,40.1 60.92,40.1 | 67.52,39.73 C403.1 67.52,36.08 U402.1 | 73.99,40.7 73.99,41.67 U405.10 U405.11 | R409.1 61.2,43 60.07,41.87 60.07,40.87 60.84,40.1 60.92,40.1 | C402.1 63.3,35.75 U401.5 62.49,35.95 62.49,37.23 60.92,38.8 Q401.2 60.92,40.1 | U405.11 71.96,42.33 70.01,44.27 | U403.8 82.74,35.91 | R410.1 77.41,44.5 R407.1 76.57,44.09 75.86,43.38 75.86,42.33 U405.11 | U405.3 70.01,44.27
  Bottom 0.18: v97.29,34.82 96.08,36.03 v96.08,47.98
VBAT  (via drill 0.3 pad 0.6)
  Top 0.3: v15.7,48.89 16.41,48.89 TP103.1 17.7,45.96 20.48,43.17 J102.3 21.84,42.43 48.86,42.43 61.19,54.76 85.08,54.76 86.37,53.46 86.37,48.75 C415.1 91.02,42.76 91.13,42.65 U407.1 | C109.1 9.27,54.71 v9.88,54.71 10.25,54.33 U102.3 U102.2
  Bottom 0.3: v15.7,48.89 v9.88,54.71
VBAT_ADC_SRC
  Top 0.18: U407.5 94.81,42 94.81,42.65 | 94.81,42.65 U407.6 94.81,42.65 | R420.1 94.87,42.59 94.81,42.65
VBAT_MEAS_EN  (via drill 0.3 pad 0.6)
  Top 0.18: U201.1 108.82,62.93 v107.38,62.93 | v89.77,47.53 90.2,47.09 R422.1
  Bottom 0.18: v107.38,62.93 106.69,63.62 99.17,63.62 89.77,54.22 v89.77,47.53
VBAT_SENSE  (via drill 0.3 pad 0.6)
  Top 0.18: U201.7 102.26,62.69 v102.23,62.69 | 96.34,43.12 95.84,43.61 R420.2 | 96.34,41.02 96.34,43.12 | v93,52.46 93.36,52.46 96.13,49.69 96.13,49.25 97.63,47.75 97.63,43.39 97.36,43.12 96.34,43.12 | R421.1 95.41,40.09 96.34,41.02 | C416.1 96.34,41.02
  Bottom 0.18: v93,52.46 93,56.97 99.31,63.28 101.64,63.28 v102.23,62.69
VBUS
  Top 0.3: 10.29,61.7 C101.1 11.85,61.22 U103.3 | 10.29,61.7 R103.1 8.59,60 8.59,59.09 9.26,58.42 10.93,58.42 10.99,58.36 11.35,58.36 U103.5 | 10.29,61.7 10.29,62.07 9.24,63.12 | 9.24,63.12 7.4,64.96 7.4,65.48 J101.A9 5.56,65.48 5.57,65.48 5.57,65.98 5.56,65.98 5.56,68.02 5.57,68.02 5.57,68.52 5.56,68.52 J101.B9 | 9.24,63.12 11.67,65.54 11.67,67 D101.5
VMAIN  (via drill 0.3 pad 0.6)
  Top 0.3: 47.24,9.61 47.3,9.61 R303.2 48.16,10.27 48.96,10.27 49.59,9.65 49.59,8.55 C304.1 48.95,7.72 | 91.75,40.34 89.03,43.05 88.76,43.05 88.42,43.39 87.91,43.39 87.57,43.05 U406.8 85.81,43.05 85.81,43.39 C411.1 | 96.72,62.23 v28.12,62.23 | 96.72,62.23 96.72,49.43 99.08,47.07 | 96.72,62.23 100.16,65.67 100.76,65.67 C202.1 C201.1 101.43,62.87 101.6,62.7 U201.9 | 47.24,9.61 47.24,15.87 45.88,17.23 39.09,17.23 36.55,14.68 36.2,14.68 35.44,13.93 35.44,12.47 L301.1 33.31,12.47 22.3,23.48 v22.3,32.88 7.52,32.88 TP106.1 2.27,38.12 R125.2 | v28.12,78.82 C406.1 32.94,78.82 33.61,79.49 33.61,80.68 33.79,80.86 | 33.79,80.86 33.85,80.92 U404.2 | 33.79,80.86 33.08,81.58 U404.8 30.75,81.58 C405.1 31.34,80.28 U404.6 | R304.2 47.24,9.61 | R201.1 99.33,47.07 99.08,47.07 | 97.71,39.12 99.08,40.48 99.08,47.07 | J201.2 97.71,39.03 97.71,39.12 | 91.75,40.34 92.97,39.12 97.71,39.12 | 91.75,40.34 R405.1 86.28,33.51 86.28,32.77 R406.1 | J301.15 48.75,7.72 48.95,7.72 | 48.95,7.72 49.25,7.72 J301.16
  Top 0.35: C302.1 34.38,12.12 L301.1
  Bottom 0.3: v22.3,32.88 28.12,38.69 v28.12,62.23 v28.12,78.82
WAKE_MDRV
  Top 0.18: J201.6 93.6,29.4 70.59,29.4 R401.1 67.49,33.69 67.13,34.05 | 67.13,34.05 66.84,34.05 66.84,35.99 63.08,39.75 Q401.3 | U402.3 67.13,34.05
(copper drawn outside any net)
  shapes: Top area x3

## Text on the board
tPlace: 1 | 2 | 3 | U404 | D102 | SOLAR | R105 | USB | R106 | L101 | C202 | C106 | U101 | C201 | C107 | U201 | Q101 | TP101 | U103 | TP102 | R117 | C109 | R414 | C412 | R415 | C413 | R416 | C414 | U105 | U102 | C112 | C418 | C203 | R412 | R413 | C110 | R411 | TP103 | R116 | D401 | C408 | TP104 | R201 | BAT | R409 | D403 | R420 | U408 | TP105 | R122 | R424 | C114 | Q401 | U104 | C416 | C113 | U406 | U405 | R124 | Y401 | U401 | U402 | C407 | U407 | TP106 | R405 | L102 | C401 | R401 | U403 | R406 | R402 | SWD | R404 | ASTRA E-INK | VGH | D303 | VGL | D302 | L301 | D301 | C308 | C310 | C311 | C302 | EPD 24
tDocu: C405 | U404 | C406 | SW401 | SW402 | SW403 | R126 | R105 | J103 | D102 | C104 | R106 | C103 | R107 | R110 | R101 | R109 | U101 | L101 | J101 | D101 | R108 | C105 | C106 | R102 | C202 | R111 | Q101 | C107 | C201 | C101 | R103 | U103 | TP101 | R104 | C108 | TP102 | C102 | R119 | R118 | R117 | C109 | R112 | R120 | U201 | R115 | U105 | R114 | D103 | R414 | R415 | R416 | U102 | C412 | C413 | C414 | C111 | R123 | R411 | R412 | R413 | C112 | R423 | C203 | C110 | R113 | R116 | C418 | C417 | TP103 | D402 | D403 | R422 | U408 | R201 | C408 | TP105 | TP104 | D401 | J102 | R407 | R410 | C411 | C415 | R424 | R409 | C410 | U405 | R420 | R122 | C409 | U406 | R417 | U407 | C416 | R418 | R421 | R125 | U104 | C114 | Q401 | R408 | R419 | C116 | C115 | C113 | R124 | C403 | C407 | TP106 | L102 | C401 | U401 | C402 | U402 | Y401 | R405 | J201 | C404 | U403 | R406 | R401 | R402 | R403 | R404 | TP301 | D303 | TP302 | D302 | C308 | L301 | Q301 | C301 | D301 | C306 | C307 | C309 | C310 | C302 | R301 | C303 | R305 | R304 | R303 | C305 | R302 | C304 | C311 | J301